# Altium PCB STM32H743I-EVAL2PCBDESIGN.PcbDoc (part 15 of 23)
Units mil, origin at the board's own origin, x right, y up, seen from the top; angles counter-clockwise.
Board outline 6558 x 5417 mil, 8 copper layers (L1_TOP, L2_GND, L3_HS1, L4_POWER, L5_SIG, L6_HS2, L7_GND, L8_BOTTOM), stack 61.368 mil thick; 620 components, 588 nets, 2945 pads, 1724 vias.
Unrouted connection lines stored in the file: 1.
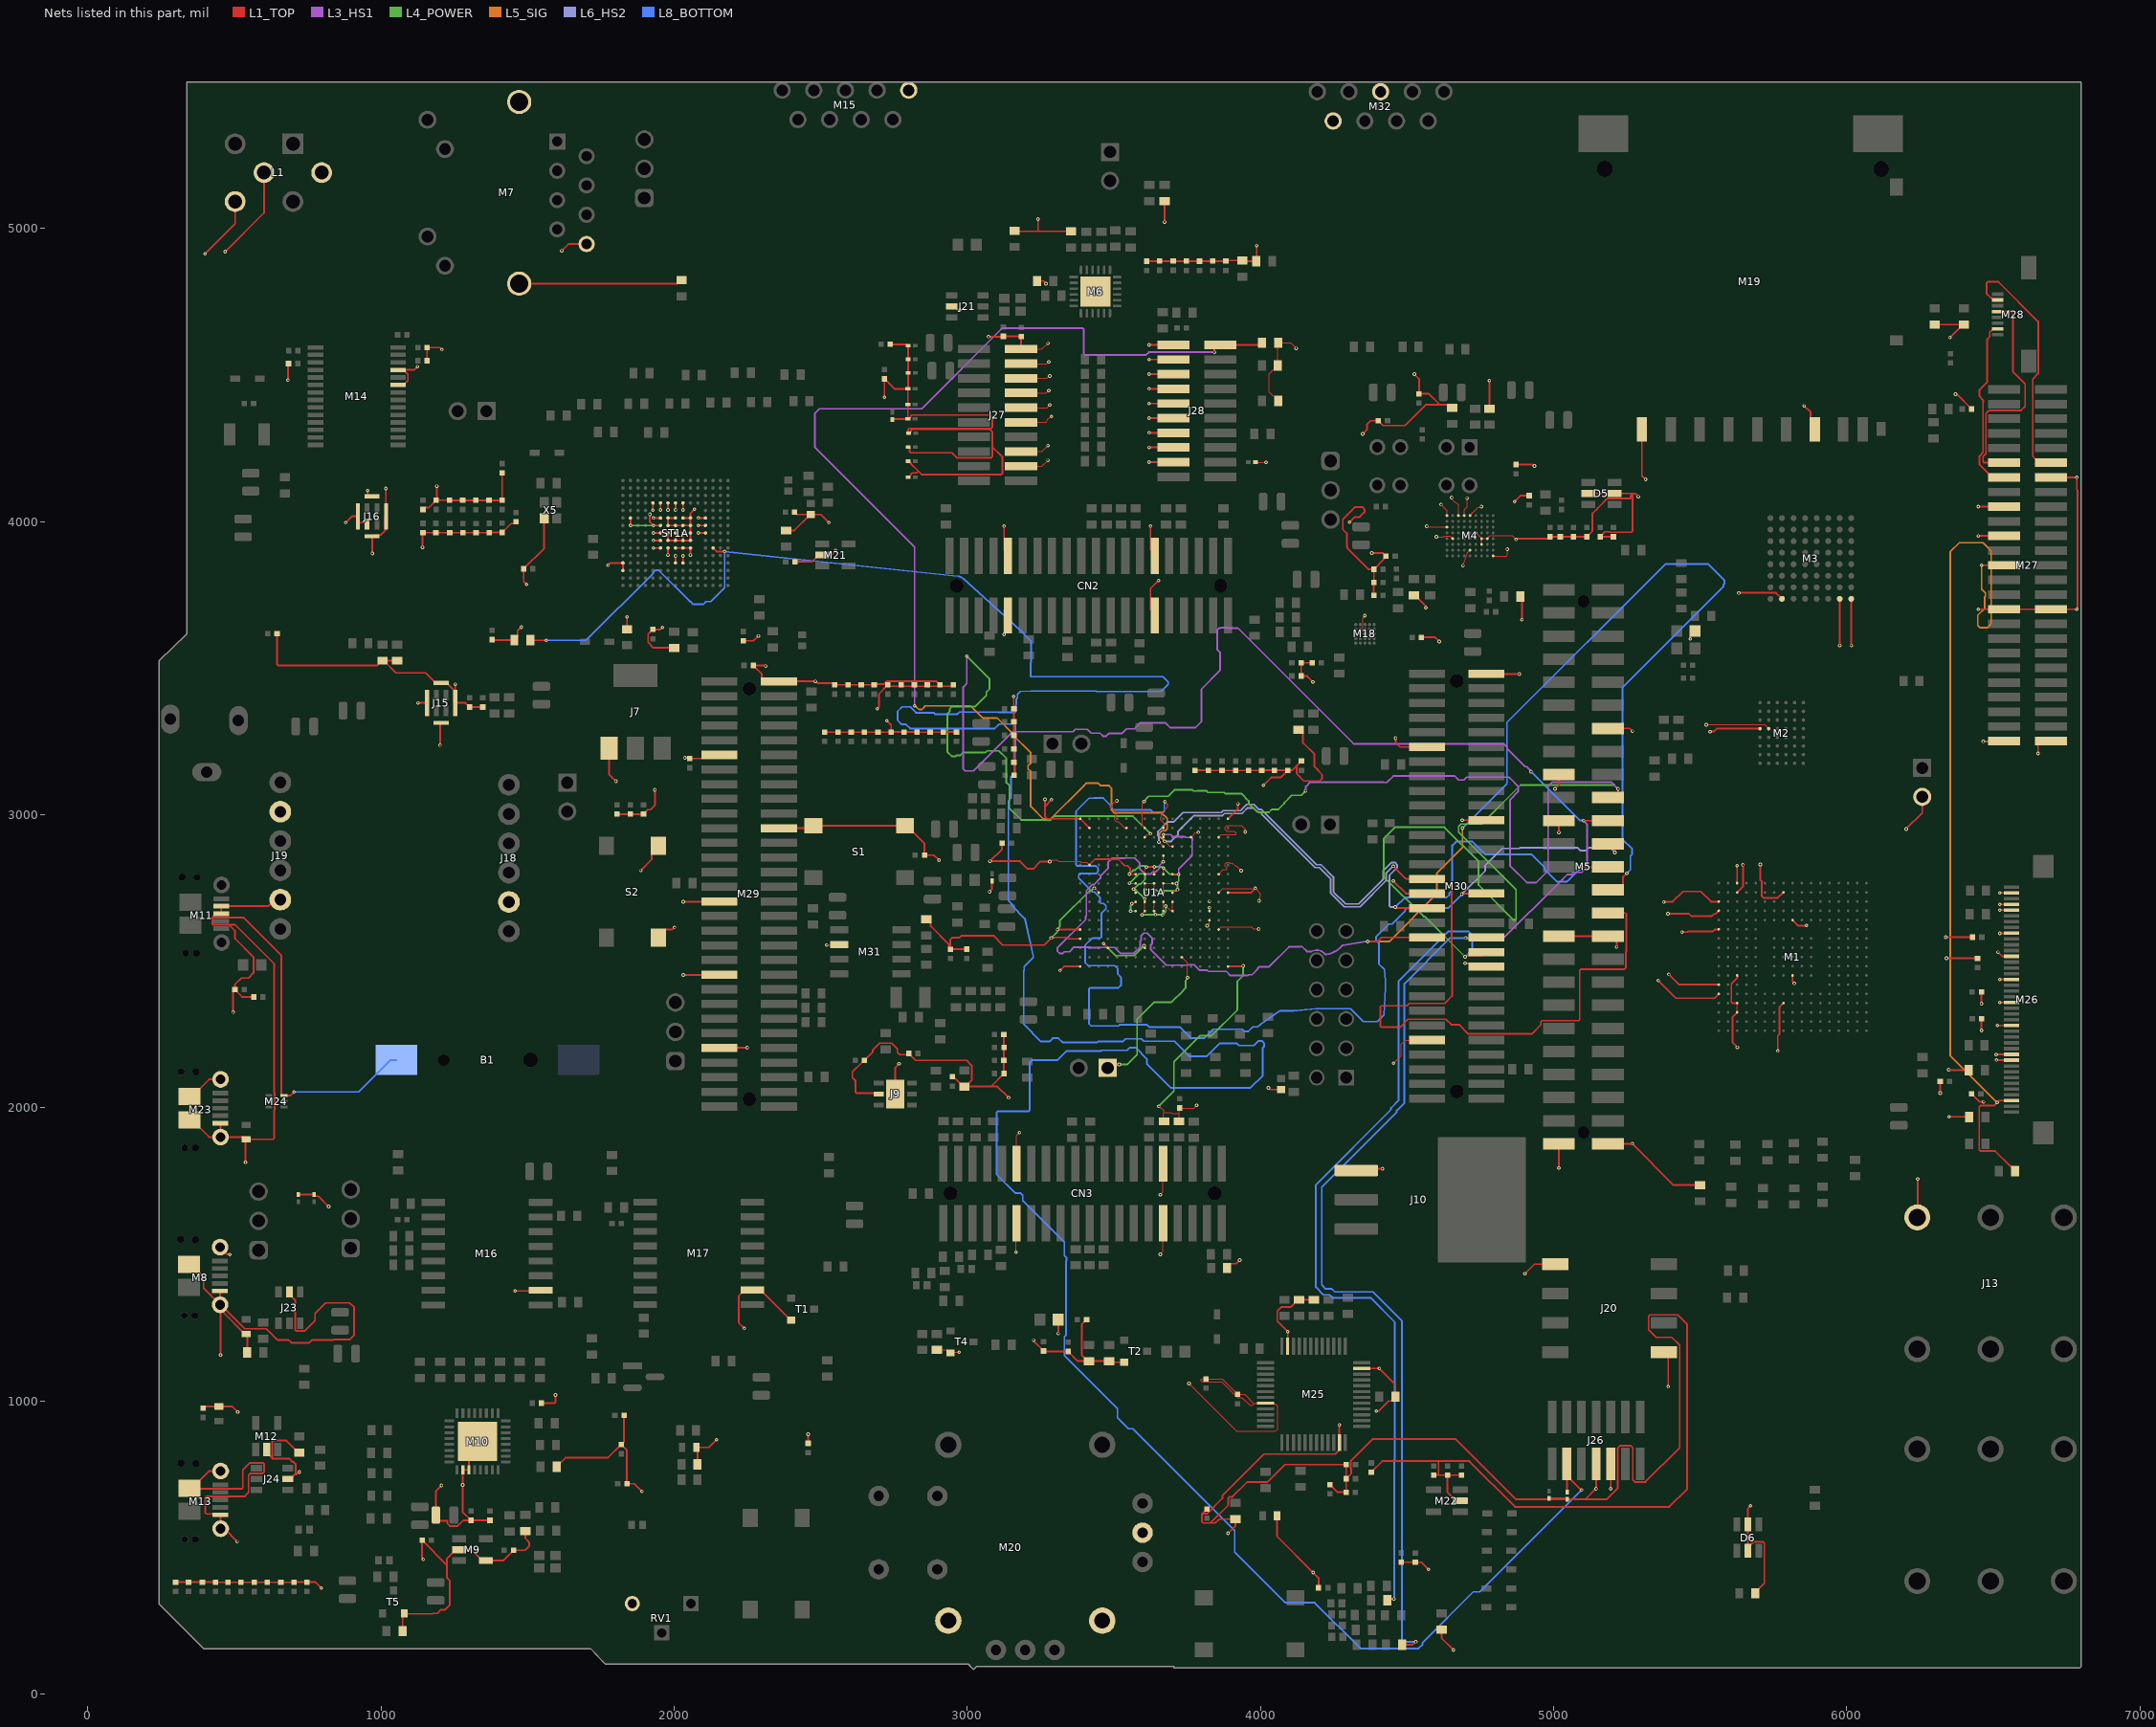
[diagram p12: the nets of this part, all layers, seen from the top]

## Via types
v1: diameter 12, hole 6, L1_TOP to L8_BOTTOM, tented both sides, 1724 vias

## Nets (pads, with @x,y where several pads share a name; then routed paths per layer and width w, separated by ;. In a path a pad name is that pad's centre, name@x,y a point inside that pad or via, vN(x,y) a via of type N, cw(c..) or ccw(c..) an arc to the next point about the centre after c; other vN are vias at no path point) (continued)
GND: B1.N C1.1 C2.1 C3.1 C4.1 C6.2 C7.2 C8.2 C9.2 C10.2 C11.2 C12.1 C13.1 C14.1 C15.1 C16.1 C17.1 C18.2 C19.2 C20.2 C21.2 C22.2 C23.2 C24.2 C25.2 C26.2 C27.2 C28.2 C29.2 C30.2 C31.2 C32.2 C33.2 C34.2 C35.2 C36.1 C37.2 C38.2 C39.2 C40.2 C41.2 C42.2 C43.2 C44.2 C45.2 C46.2 C47.1 C48.2 C49.2 C50.2 C51.2 C52.2 C53.2 C54.2 C55.2 C56.2 C57.2 C58.2 C59.2 C60.2 C61.2 C62.2 C63.2 C64.2 C65.2 C66.2 C67.2 C68.2 C69.2 C70.2 C71.2 C72.2 C73.2 C74.2 C75.2 C76.2 C77.2 C78.2 C79.2 C85.2 C87.2 C88.2 C89.2 C92.2 C93.2 C94.2 C95.2 C97.2 C98.2 C99.2 C100.2 C101.2 C102.2 C103.2 C104.1 C105.2 C106.2 C107.2 C108.2 C109.2 C110.2 C111.2 C112.2 C113.2 C114.2 C115.2 C116.2 C118.2 C119.2 C121.2 C124.2 C125.2 C126.2 C127.2 C128.2 C129.2 C130.2 C131.2 C132.2 C133.1 C134.2 C135.2 C136.2 C137.2 C138.2 C139.2 C140.2 C141.2 C142.2 C143.2 C144.2 C145.2 C146.2 C147.2 C148.2 C149.2 C150.2 C151.2 C152.2 C153.2 C154.2 C155.2 C156.2 C157.2 C158.2 C159.2 C160.2 C161.2 C162.2 C163.2 C164.2 C165.2 C166.2 C167.2 C168.2 C170.2 C171.2 C172.1 CN2.09 CN2.10 CN2.29 CN2.30 CN3.09 CN3.10 CN3.29 CN3.30 D2.2 D5.2 D5.5 D6.2 D6.5 D7.2 D10.2 D11.2 D12.2 D15.1 D22.2 D23.2 D24.2 D25.2 D26.2 D27.2 D28.2 D29.2 D30.2 D31.2 D32.2 D33.2 D34.2 D35.2 D36.2 D37.2 D38.2 J7.1 J9.2 J9.7 J10.1 J12.2 J13.3 J15.5 J16.2 J16.5 J18.2 J19.2 J19.5 J20.02 J20.07 J21.2 J23.2 J24.2 J25.1 J26.5 J26.7 J27.3 J27.5 J27.9 J27.11 J27.13 J27.15 J27.17 J27.19 J28.4 J28.6 J28.8 J28.10 J28.12 J28.14 J28.16 J28.18 J28.20 L1.4 L1.5 L1.6 L4.2 L7.2 LD1.1 M1.A3 M1.B3 M1.B8 M1.C1 M1.D1 M1.E9 M1.F1 M1.L3 M1.L9 M1.M1 M1.N1 M1.P3 M1.P8 M1.R3 M2.D1 M2.D2 M3.H2 M3.H7 M3.H8 M4.A1 M4.A3 M4.A4 M4.A5 M4.C1 M4.D6 M4.E2 M4.E7 M4.E8 M4.F7 M4.G5 M4.H9 M5.1 M5.2 M5.19 M5.20 M5.30 M5.34 M5.37 M6.25 M7.8 M7.13 M7.14 M8.5 M8.6 M8.7 M8.10 M9.2 M9.4 M10.18 M10.19 M10.33 M11.2 M11.3 M12.2 M13.5 M13.6 M13.7 M13.10 M14.23 M14.25 M15.5 M16.10 M17.10 M18.C3 M19.6 M19.9 M20.5 M20.7 M20.8 M21.2 M22.2 M23.5 M23.6 M23.7 M23.10 M23.11 M24.3 M25.8 M25.23 M25.35 M25.47 M26.10 M26.11 M26.16 M26.20 M26.24 M26.28 M26.32 M26.36 M26.37 M26.39 M27.01 M27.02 M27.19 M27.20 M27.30 M27.34 M27.37 M29.10 M29.20 M29.30 M29.39 M29.50 M29.59 M30.10 M30.19 M30.30 M30.39 M30.50 M30.59 M31.2 M32.3 M32.6 R34.2 R37.2 R67.2 R70.2 R72.2 R97.2 R114.2 R115.1 R116.1 R118.1 R120.2 R122.2 R136.1 R137.2 R142.2 R143.2 R144.2 R149.2 R150.2 R155.1 R159.2 R160.2 R176.2 R177.1 R185.2 R188.2 R205.2 R210.1 R211.2 R225.2 R227.2 R228.1 R231.1 R233.1 R234.1 R239.1 R240.2 R245.1 R247.1 R248.1 R257.2 R258.2 R259.2 R260.2 R265.2 R266.1 RV1.1 S1.3 S1.4 S2.3 S2.4 SB39.2 ST1A.D5 ST1A.D6 ST1A.D7 ST1A.D8 ST1A.D9 ST1A.F2 ST1A.F6 ST1A.F7 ST1A.F8 ST1A.F9 ST1A.F10 ST1A.F12 ST1A.G2 ST1A.G6 ST1A.G7 ST1A.G8 ST1A.G9 ST1A.G10 ST1A.G12 ST1A.H6 ST1A.H7 ST1A.H8 ST1A.H9 ST1A.H10 ST1A.H12 ST1A.J6 ST1A.J7 ST1A.J8 ST1A.J9 ST1A.J10 ST1A.K6 ST1A.K7 ST1A.K8 ST1A.K9 ST1A.K10 ST1A.M1 ST1A.M8 ST1A.M9 ST1A.N1 T1.2 T2.2 T4.2 T5.2 U1A.A1 U1A.A17 U1A.B2 U1A.B6 U1A.C10 U1A.C13 U1A.C16 U1A.F2 U1A.G7 U1A.G8 U1A.G9 U1A.G10 U1A.G11 U1A.G16 U1A.H7 U1A.H8 U1A.H9 U1A.H10 U1A.H11 U1A.J3 U1A.J7 U1A.J8 U1A.J9 U1A.J10 U1A.J11 U1A.J16 U1A.J17 U1A.K7 U1A.K8 U1A.K9 U1A.K10 U1A.K11 U1A.K15 U1A.L7 U1A.L8 U1A.L9 U1A.L10 U1A.L11 U1A.L15 U1A.M15 U1A.N1 U1A.N16 U1A.P1 U1A.R4 U1A.R8 U1A.T12 U1A.U1 U1A.U17 X5.2 | length 54274.5
  L1_TOP w2: v1(3433.07,2748.98) U1A.J3@3448.04,2734.01 ; v1(3464.57,2560) U1A.R4@3479.54,2545.03 ; v1(3603,2553) 3604.26,2551.74 3604.26,2546.29 U1A.R8@3605.52,2545.03 ; U1A.C10@3668.51,2922.98 3668.76,2923.23 3668.76,2931.76 v1(3669,2932) ; U1A.C13@3763,2922.98 3779,2938.98 3786.98,2938.98 v1(3788,2940) ; v1(3818,2621) 3825.99,2628.99 U1A.M15@3825.99,2639.52 ; U1A.L15@3825.99,2671.02 v1(3825.99,2682.3) ; U1A.K15@3825.99,2702.51 v1(3826,2704) ; v1(4356,3679) 4349,3672 4349,3624 4356,3617 M18.C3@4356.5,3617 ; v1(4600,3948) 4623.33,3948 4626.33,3951 4646.94,3951 M4.E2@4655.94,3942 ; v1(4691,3850) 4702.12,3880.13 4705,3892.63 4705.59,3893.22 M4.G5@4715,3902.63 ; M4.D6@4734.69,3961.69 M4.E7@4754.37,3942 ; M4.F7@4754.37,3922.31 M4.E7@4754.37,3942 ; v1(4872,3939) 4859,3952 4784.06,3952 M4.E8@4774.06,3942 M4.E7@4754.37,3942
  L1_TOP w4: v1(2520,2555) 2560.7,2555 M31.2@2562.7,2557 ; R177.1@2896,1173.44 2930.82,1173.44 2940.66,1163.6 T4.2@2942.63,1163.6 2945.03,1166 v1(2972,1166) ; v1(3166,1507) 3166,1604 CN3.30@3168,1606 ; CN3.29@3168,1808.99 3168,1905 v1(3178,1915) ; J27.3@3183.12,4189 3255,4189 v1(3275,4209) ; J27.5@3183.12,4239 3255,4239 v1(3275,4259) ; J27.9@3183.12,4339 3270.03,4339 3272.86,4341.83 3272.86,4346.69 3285.16,4359 v1(3287,4359) ; J27.11@3183.12,4389 3272,4389 v1(3281,4398) ; J27.13@3183.12,4439 3269.03,4439 3277.03,4447 v1(3278,4447) ; J27.15@3183.12,4489 3272.03,4489 3280.03,4497 v1(3281,4497) ; J27.17@3183.12,4539 3269.84,4539 3275.84,4545 v1(3278,4545) ; J27.19@3183.12,4589 3255,4589 v1(3275,4609) ; v1(3281,2840) 3283.16,2840 3289.16,2846 3304.97,2846 3306.82,2844.15 3307.88,2844.15 3312.03,2840 3386.27,2840 3388.77,2837.5 3407.54,2837.5 U1A.F2@3416.54,2828.5 ; v1(3510,3047) 3507.84,3047 3501.84,3041 3500.03,3041 3493,3033.97 3493,3024.03 3507,3010.03 3507,2994.67 3502.03,2989.7 3502.03,2982.25 3507.3,2976.98 3515.41,2976.98 3536.97,2955.41 3541.6,2955.41 U1A.B6@3542.53,2954.48 ; v1@3553.56,2765.5 U1A.H7@3574.02,2765.5 ; v1@3553.56,2797 U1A.G7@3574.02,2797 ; v1(3557,2671) U1A.L7@3574.02,2671.02 ; v1(3561,2696) 3562.53,2697.53 3567.73,2697.53 3572.71,2702.51 U1A.K7@3574.02,2702.51 ; v1(3567,2746) 3568.53,2744.47 3568.53,2740.82 3574.02,2735.32 U1A.J7@3574.02,2734.01 ; v1(3596,2658) 3597.53,2659.53 3597.53,2663.03 3605.27,2670.77 3605.52,2670.77 U1A.K8@3605.52,2702.51 3605.26,2702.78 3605.26,2712.75 v1(3604.99,2713.02) ; v1(3604.99,2744.51) 3605.26,2744.25 3605.26,2734.27 U1A.J8@3605.52,2734.01 v1@3605.52,2713.54 ; v1@3605.52,2745.04 U1A.H8@3605.52,2765.5 U1A.H9@3637.02,2765.5 U1A.J9@3637.02,2734.01 ; U1A.G8@3605.52,2797 3605.52,2813.35 3611,2818.84 v1(3611,2821) ; U1A.K9@3637.02,2702.51 3637.02,2686.77 U1A.L9@3637.02,2671.02 3637.95,2670.09 3637.95,2664.38 3640.97,2661.36 v1(3640.97,2659.19) ; U1A.G9@3637.02,2797 3637.51,2797.49 3637.51,2818.6 v1@3637.02,2819.09 ; v1(3653,2005) 3653.44,2005 3661.71,1996.73 3664.27,1996.73 3671,1990 3671,1983.34 ; v1(3658,1499.99) 3668,1509.99 CN3.10@3668,1606 ; v1(3658,1702.98) 3668,1712.98 CN3.09@3668,1808.99 ; v1(3666,2658) 3666,2660.16 3667.58,2661.75 3667.58,2670.09 U1A.L10@3668.51,2671.02 U1A.K10@3668.51,2702.51 ; U1A.J10@3668.51,2734.01 U1A.H10@3668.51,2765.5 U1A.H11@3700.01,2765.5 3700.26,2765.25 3713.75,2765.25 v1(3714,2765) ; U1A.G10@3668.51,2797 v1@3668.51,2817.46 ; R72.2@3671,1953.56 3668.66,1955.9 3668.66,1981 3671,1983.34 ; v1(3677,2688) 3693.05,2671.95 3699.08,2671.95 U1A.L11@3700.01,2671.02 U1A.K11@3700.01,2702.51 ; J28.8@3694.88,4311 J28.8@3702.88,4303 ; J28.20@3694.88,4611 J28.20@3702.88,4603 ; U1A.J11@3700.01,2734.01 3708.47,2742.47 3715.47,2742.47 v1(3717,2744) ; U1A.G11@3700.01,2797 v1@3720.47,2797 ; R67.2@3722,1953.56 3722,1981 ; U1A.T12@3731.5,2513.54 3751,2494.04 v1(3751,2444) ; v1(3756,1059) 3919.25,895.75 4050.49,895.75 4058.33,903.59 4058.33,981.99 4050.49,989.83 4017,989.83 4014.91,991.92 3980.62,991.92 3972.7,984 3963.65,984 3936.27,1011.38 3921.05,1011.38 3868.05,1064.38 3801.15,1064.38 3796.36,1069.18 3796.36,1072.49 3798.7,1074.83 3868.92,1074.83 3921.92,1021.83 C162.2@3922,1021.83 3945.66,1021.83 3975.49,992 M25.8@4017,992 ; v1(3782,2008) 3773.17,1999.17 C20.2@3724,1999.17 3722,1997.17 3722,1981 ; U1A.N16@3857.49,2608.02 3866.49,2617.02 3931.37,2617.02 ; U1A.J16@3857.49,2734.01 3871.48,2748 3971,2748 3976.69,2742.31 ; U1A.G16@3857.49,2797 3873.53,2813.04 3883.71,2813.04 3886.06,2815.38 3886.06,2818.7 3879.98,2824.77 3879.98,2832.22 3885.26,2837.5 3892.71,2837.5 3896.21,2834 3904.54,2834 3914.53,2824.01 3918.99,2824.01 v1(3934,2809) ; U1A.C16@3857.49,2922.98 3866.49,2931.98 3914.8,2931.98 3917.15,2934.33 3917.15,2937.64 3910.59,2944.2 3886.54,2944.2 3879.98,2950.75 3879.98,2958.21 3885.26,2963.48 3935.18,2963.48 3945,2953.66 3945,2953 3948,2950 v1(3948,2940.83) ; 3931.39,2617 3968.73,2617 3975.73,2610 v1(3994,2610) ; v1(3982,2749) 4001,2730 4001,2722.16 3996.53,2717.7 3996.53,2707.53 v1(3995,2706) ; D33.2@3983.3,4203 3983.8,4202.5 4018.5,4202.5 v1(4019,4202) ; R258.2@4060.56,4412 4030,4442.56 4030,4503.44 R259.2@4059.56,4533 4059.56,4609 R260.2@4060.56,4610 4103,4610 v1(4122,4591) ; v1(4454,2152) 4479.77,2177.77 4479.77,2216.77 4494,2231 M30.10@4568,2231 ; v1(4567,3984) 4569.16,3984 4571.79,3981.37 4635.74,3981.37 M4.C1@4636,3981.11 ; v1(4616,4058) 4636.26,4037.74 M4.A1@4636.26,4020.74 ; v1(4652,4082) 4655.37,4074.27 4660.6,4069.04 4673.29,4060.71 4675.63,4058.37 4675.63,4021.26 M4.A3@4675.37,4021 ; M4.A4@4695.57,4021 4695.57,4040.34 4705,4049.77 v1(4705,4080) ; M4.A5@4715.26,4021 4722.49,4028.23 4722.49,4028.39 4732.1,4038 4732.26,4038 4743.73,4049.47 4752.47,4049.47 v1(4754,4051) ; M4.H9@4794,3883.2 4794.23,3882.97 4838.97,3882.97 4842,3886 v1(4842,3906) ; v1(5521,3307) 5720.42,3307 M2.D2@5733.89,3293.53 ; M1.R3@5626.51,2325.54 M1.P3@5626.51,2357.04 ; 3671,1983.34 3695.33,1983.34 3697.67,1981 3722,1981
  L1_TOP w6: C52.2@299,381 C63.2@343,381 C53.2@390,381 C54.2@435,381 435.33,380.67 C55.2@478,380.67 478.17,380.83 C62.2@522,380.83 522.17,380.67 C59.2@567,380.67 567.17,380.83 C60.2@611,380.83 C48.2@658,380.83 C66.2@703,380.83 703.17,381 C49.2@747,381 776,381 v1(796,361) ; M8.10@344.3,1465.37 352.3,1465.37 394.09,1423.57 394.09,1384.07 M8.7@450.59,1327.57 450.59,1373.83 M8.5@449.61,1374.82 ; M13.10@346.3,701.37 M13.10@354.3,701.37 ; C116.2@393,974.83 398.77,980.61 D10.2@446,980.61 492.39,980.61 v1(511,962) ; v1(399,4914) 502,5017 L1.4@502,5092.15 ; 424.11,2650 436.11,2662 M11.3@454.61,2662 M11.2@454.61,2687.59 615.19,2687.59 637.6,2710 J19.5@656,2710 ; M8.6@450.59,1524.43 476.02,1499 v1(484,1499) ; M23.5@451.31,1947.19 452.3,1946.2 M23.7@452.3,1899.94 ; v1(452,1156) M8.7@452,1326.17 ; M23.6@452.3,2096.8 413.06,2096.8 354,2037.74 M23.10@346,2037.74 M23.11@346,1959 354,1959 413.06,1899.94 M23.7@452.3,1899.94 ; M13.6@452.59,760.43 413.35,760.43 M13.10@354.3,701.37 ; M8.7@460.35,1317.82 460.35,1303.12 535.08,1228.39 D7.2@540,1228.39 543.44,1224.95 R149.2@543.44,1165 ; M8.7@461.49,1318.95 534.66,1245.78 608.63,1245.78 646.4,1208 683.93,1208 693.93,1198 754.87,1198 764.87,1208 837.86,1208 838.86,1209 892.65,1209 908,1224.35 908,1318.65 892.65,1334 810.47,1334 774.39,1297.91 774.39,1274.09 738.3,1238 710.5,1238 706.4,1242.1 706.4,1344.1 687,1363.5 J23.2@687,1371.75 ; v1(468,4921) 600.43,5053.43 L1.5@600.43,5190.57 ; v1(495,2326) 495,2396.83 C4.1@501.17,2403 501.17,2421.3 522.53,2442.66 547.18,2442.66 564.4,2459.88 564.4,2514.12 501.17,2577.35 501.17,2604.42 481.18,2624.41 ; C4.1@501.17,2402.92 526.08,2378 C3.1@565.17,2378 ; v1(509,520) 465.43,563.57 M13.7@452.59,563.57 452.59,609.83 448.02,614.41 403.57,614.41 400.05,617.92 400.05,670.49 403.57,674 535.04,674 548,686.96 548,746.9 552.8,751.7 595.7,751.7 600.5,756.5 600.5,784.3 596.4,788.4 552.1,788.4 528,764.3 528,703.11 524.49,699.59 356.07,699.59 M13.10@354.3,701.37 ; v1(537,1814) 537,1890.39 D22.2@539,1892.39 ; M12.2@610,833.72 610,821.91 628.81,803.1 632.69,803.1 ; C6.2@644.67,3618 644.67,3512.51 648.18,3509 986.77,3509 990.28,3512.51 990.28,3514.66 1001.06,3525.44 R227.2@1005,3525.44 ; J24.2@681.75,733 J24.2@690,733 ; v1(682,4483) 682,4536.83 C121.2@684.17,4539 ; v1(703,2054) 690.69,2041.69 M24.3@668.59,2041.69 661.7,2041.69 659.78,2043.61 659.78,2519.36 530.73,2648.41 426.45,2648.41 424.11,2646.07 424.11,2626.75 426.45,2624.41 481.18,2624.41 ; D25.2@718,1703.3 D26.2@771,1703.3 771,1701 773.91,1698.09 785.91,1698.09 v1(821,1663) ; v1(721,757) 719.38,757 711.45,749.07 706.07,749.07 J24.2@690,733 ; R185.2@721,823.44 717.06,823.44 676.16,864.35 632.69,864.35 628.59,860.25 628.59,807.2 632.69,803.1 ; v1(879,3996) 901,4018 J16.5@920.77,4018 920.77,4000.19 924.66,3996.3 947.39,3996.3 J16.2@952.27,3991.43 ; v1(954,4106) 954,4089.8 957.89,4085.91 J16.5@969,4085.91 ; v1(970,3891) 970,3949.09 J16.5@969,3950.09 972.89,3953.98 998.9,3953.98 1013.34,3968.42 1013.34,4014.11 J16.5@1017.23,4018 1016,4019.23 v1(1016,4113) ; R233.1@1055,3525.44 1008.94,3525.44 1050.43,3483.94 1151.43,3483.94 1186.03,3449.34 1223.43,3449.34 1249.07,3423.7 1249.07,3385.31 J15.5@1252.96,3381.43 ; M14.23@1058,4466.39 1077,4466.39 1091.5,4480.89 1091.5,4503.07 M14.25@1077,4517.57 ; M14.25@1058,4517.57 M14.25@1077,4517.57 ; R188.2@1073.56,214 1073.56,268.79 T5.2@1079.4,274.63 1081.03,273 1176.14,273 1177.77,274.63 1192.14,274.63 1204.51,287 1218.65,287 1234,302.35 1234,387.46 1224,397.46 1224,439.92 ; v1(1124,4529) 1112.57,4517.57 M14.25@1077,4517.57 ; v1@1125,3381 v1(1125.43,3381.43) J15.5@1156.5,3381.43 ; v1(1141,3912) 1141,3960.17 C148.2@1143,3962.17 1186.83,3962.17 C147.2@1187,3962.33 1187.33,3962 C143.2@1234,3962 C144.2@1279,3962 C145.2@1324,3962 1324.17,3962.17 C139.2@1369,3962.17 1369.83,3963 C141.2@1413,3963 1413.08,3963 1443.04,3992.95 1453.78,3992.95 C142.2@1460,3999.17 ; C155.2@1143,4041.17 1149.22,4047.38 1162.3,4047.38 1187.92,4073 C154.2@1188,4073 ; v1(1144,459) 1140,463 C104.1@1140,524 1140,523.92 1224,439.92 ; C118.2@1156.83,4549 1156.83,4593.83 C119.2@1157,4594 1200,4594 v1(1207,4587) ; v1(1190,4121) 1190,4075 C154.2@1188,4073 ; v1(1201,3237) 1201,3309.78 J15.5@1204.73,3313.51 ; v1(1206,711) 1187,692 SB39.2@1187,610 1187,602.16 1198.66,590.5 1226,590.5 1226,581.49 1234.49,573 1261.51,573 1280.67,592.17 C111.2@1307,592.17 ; v1(1253,3445) 1253,3381.46 J15.5@1252.96,3381.43 ; M10.33@1329,861 1299,831 M10.19@1299,764.5 M10.18@1279,764.5 1278,763.5 v1(1278,713) 1278,621.08 1306.92,592.17 C111.2@1307,592.17 ; C89.2@1347,3367.17 C85.2@1302,3367.17 1301.92,3367.17 1287.66,3381.43 J15.5@1252.96,3381.43 ; C112.2@1371,592 1370.83,592.17 C111.2@1307,592.17 ; C151.2@1379,3597.17 1380.17,3596 R257.2@1454.44,3596 1465.22,3606.78 1465.22,3627.22 v1(1478,3640) ; C172.1@1413,4166.33 C140.2@1413,4072.83 C146.2@1368,4072.83 1323.17,4072.83 C149.2@1323,4072.67 1278.17,4072.67 C150.2@1278,4072.83 1233.17,4072.83 C153.2@1233,4073 C154.2@1188,4073 ; v1(1457,1375) 1542.27,1375 M16.10@1544.27,1377 ; M7.14@1470.99,4811.98 2009.48,4811.98 2021.06,4823.56 R37.2@2025,4823.56 ; C132.2@1486.17,3839 1486.17,3795.83 v1(1496,3786) ; C132.2@1486.17,3839.08 1556,3908.92 X5.2@1556,4010.88 ; R159.2@1492,555.44 1492,530.64 1505,517.64 1505,503.62 1491.38,490 C105.2@1451.67,490 1451.67,489.92 1416.35,454.6 M9.4@1357.28,454.6 1345.46,454.6 1308.06,492 M9.2@1266.72,492 1254.91,492 1224,461.09 1224,439.92 ; C110.2@1546.83,992 1591.49,992 1595,995.51 v1(1595,1020) ; R176.2@1598.56,775 1629.56,806 1774.25,806 1818.92,850.67 C113.2@1819,850.67 C113.2@1819.08,850.67 ; v1(1616,4924) 1639.02,4947.02 M7.8@1700.91,4947.02 ; v1(1774,3851) 1781.82,3858.82 ST1A.M1@1825.05,3858.82 ST1A.N1@1825.05,3833.23 ; J7.1@1777.45,3226.98 1777.45,3137.55 v1(1801,3114) ; C11.2@1805,3002 C10.2@1850,3002 1894.83,3002 C8.2@1895,3002.17 1895.08,3002.17 1909.79,3016.87 1919.25,3016.87 1934,3031.62 v1(1934,3085) ; C115.2@1828.83,950 1828.83,860.5 1825.3,856.97 1825.3,856.88 C113.2@1819.08,850.67 ; R225.2@1839,3633 v1(1839,3675) ; v1(1850.64,3986.77) ST1A.F2@1850.64,4012.36 ; v1(1886,2810) 1922.99,2846.99 1922.99,2870.91 S2.4@1945.58,2893.5 ; v1(1890,691) 1864,717 C114.2@1838.67,717 1838.67,831.08 C113.2@1819.08,850.67 ; v1(1917,4025) 1917,3998.64 v1(1928.87,3986.77) ST1A.G6@1953,3986.77 ; v1(1927,4039) 1927,4063.13 ST1A.D5@1927.41,4063.54 ; v1(1928.87,3910) ST1A.K6@1953,3910 ; v1(1928.87,3935.59) ST1A.J6@1953,3935.59 ; v1(1928.87,3961.18) ST1A.H6@1953,3961.18 ; v1(1928.87,4012.36) ST1A.F6@1953,4012.36 ; S2.3@1945.58,2580.5 1945.58,2585.43 1968.17,2608.02 1994.02,2608.02 v1(2001,2615) ; v1(1953,4039.41) ST1A.D6@1953,4063.54 ; v1(1960,3639) 1952.83,3631.83 C130.2@1927,3631.83 1926.92,3631.83 1910.7,3615.62 1910.7,3588.05 1929.31,3569.44 R228.1@2000,3569.44 ; v1(1978.59,3885.87) ST1A.K7@1978.59,3910 ; ST1A.H7@1978.59,3961.18 ST1A.J7@1978.59,3935.59 ST1A.J8@2004.18,3935.59 ; v1(1978.59,4039.41) ST1A.D7@1978.59,4063.54 ; ST1A.M8@2004.18,3858.82 v1(2004.18,3882.95) ; ST1A.K8@2004.18,3910 ST1A.K9@2029.77,3910 ST1A.K10@2055.36,3910 v1(2055.36,3885.87) ; ST1A.H8@2004.18,3961.18 ST1A.J8@2004.18,3935.59 ; ST1A.F8@2004.18,4012.36 ST1A.F7@1978.59,4012.36 ST1A.G7@1978.59,3986.77 ST1A.G8@2004.18,3986.77 ST1A.G9@2029.77,3986.77 ST1A.G10@2055.36,3986.77 ; v1(2004.18,4039.41) ST1A.D8@2004.18,4063.54 ; ST1A.M9@2029.77,3858.82 v1(2029.77,3882.95) ; ST1A.H9@2029.77,3961.18 ST1A.J9@2029.77,3935.59 ; ST1A.F9@2029.77,4012.36 ST1A.F10@2055.36,4012.36 ; v1(2029.77,4039.41) ST1A.D9@2029.77,4063.54 ; v1(2031,2453) M29.20@2153.5,2453 ; v1(2031,2703) M29.30@2153.5,2703 ; v1(2036,3194) 2050.67,3194 C171.2@2053,3191.67 2094.65,3191.67 2106.98,3204 M29.50@2154.5,3204 ; v1(2069,4042) 2055.36,4028.36 ST1A.F10@2055.36,4012.36 ; R211.2@2079.56,783 2079.56,837.05 D12.2@2075.61,841 2118,841 v1(2144,867) ; v1(2082.41,3961.18) ST1A.H12@2106.54,3961.18 ; v1(2082.41,3986.77) ST1A.G12@2106.54,3986.77 ; v1(2082.41,4012.36) ST1A.F12@2106.54,4012.36 ; M29.10@2155.5,2205 v1(2249,2205) ; C131.2@2236,3593.17 2270.17,3593.17 v1(2287,3610) ; v1(2239,1247) 2220.11,1265.89 2220.11,1358.24 2230.11,1368.24 2230.11,1369.19 2238.92,1378 M17.10@2267.27,1378 2295.61,1378 2304.43,1369.19 2304.43,1367.83 2396.66,1275.6 T1.2@2398.63,1275.6 ; C170.2@2269.83,3508.92 2298.98,3479.77 2298.98,3465 2309.98,3454 M29.59@2357.5,3454 ; C170.2@2269.83,3509 2310,3509 v1(2312,3507) ; M29.39@2357.5,2954 2465.92,2954 S1.4@2474.5,2962.58 S1.3@2787.5,2962.58 2792.42,2962.58 2853.83,2901.17 C21.2@2853.83,2862 2886,2862 v1(2903,2845) ; M29.59@2358.5,3455 v1(2481,3455) 2482.62,3455 2488.57,3449.05 2540.78,3449.05 C37.2@2547,3442.83 C38.2@2593,3442.83 C39.2@2638,3442.83 C40.2@2682,3442.83 2684.17,3445 2714.84,3445 2720.7,3450.86 2720.7,3451.5 2724.2,3455 2894.75,3455 2905.15,3444.6 2908.76,3444.6 C44.2@2915.36,3438 ; R231.1@2382,3969.56 2409.29,3969.56 2464.03,4024.3 D15.1@2466,4024.3 ; C152.2@2410.83,4032 2410.83,4031.92 2418.45,4024.3 D15.1@2466,4024.3 ; C133.1@2411.83,3863 2469.91,3863 2492.91,3886 M21.2@2504.72,3886 2536,3886 v1(2551,3901) ; C106.2@2457,855 v1(2457,886) ; C35.2@2513,3281.67 C33.2@2559,3281.67 2559.17,3281.5 C32.2@2604,3281.5 2604.17,3281.67 C31.2@2649,3281.67 C30.2@2695,3281.67 C29.2@2740,3281.67 ; v1(2528,3996) 2499.7,4024.3 D15.1@2466,4024.3 ; v1(2692.72,3361.31) 2698.3,3366.89 2698.3,3412.22 2728.92,3442.83 C41.2@2729,3442.83 2733.83,3438 C42.2@2774,3438 ; J9.2@2697.5,2047 2694.37,2050.13 2621.51,2050.13 2618,2053.65 2618,2093.47 2608,2103.47 2608,2122.53 2641.17,2155.7 2642.62,2155.7 2648.83,2161.92 2648.83,2162.08 2677.72,2190.97 2677.72,2197.55 2700.38,2220.22 2741.62,2220.22 2761.14,2200.7 2761.14,2189.74 2769.88,2181 2796.33,2181 C2.1@2800.33,2185 ; v1(2717,4424) C93.2@2717,4487.17 ; C93.2@2717.08,4487.17 2751.25,4453 D30.2@2797,4453 ; v1(2725.43,3320.57) 2740,3306 C29.2@2740,3281.67 ; C92.2@2736.83,4605 2790.54,4605 2795.54,4600 D27.2@2798,4600 D28.2@2798,4554 D29.2@2798,4507 2797.5,4506.5 2797.5,4453.5 D30.2@2797,4453 ; D32.2@2744,4348.7 2745.15,4349.85 2795.85,4349.85 D38.2@2797,4351 ; J9.7@2754,2047 2754,2137 v1(2767,2150) ; C42.2@2774,3443 C42.2@2774,3438 ; D35.2@2797.7,4152 2800.16,4152 2806.94,4158.78 2806.94,4160.8 2812.45,4166.32 2827.09,4166.32 2832.61,4171.83 ; D37.2@2797.7,4254 2800.16,4254 2803.06,4251.09 2803.06,4239.25 2807.37,4234.94 2947.56,4234.94 2965.06,4217.43 3080.7,4217.43 3084.8,4221.53 3084.8,4255.2 ; D36.2@2798,4206 2800.46,4206 2807.24,4199.22 2807.24,4197.2 2832.61,4171.83 ; C2.1@2800.33,2184.92 2823.78,2161.47 2997.49,2161.47 3014.72,2144.24 3014.72,2093.22 R97.2@2993.94,2072.44 ; C45.2@2819,3442.83 C45.2@2819,3438 ; R265.2@2860,2642.56 2863.94,2642.56 2874.72,2631.78 2874.72,2619.78 2935.7,2558.8 2935.7,2547.05 2941.92,2540.83 C1.1@2942,2540.83 ; C43.2@2863,3442.83 C43.2@2863,3438 ; C44.2@2907,3442.83 C44.2@2907,3438 ; J21.2@2946.25,4734 2954.5,4734 2967.5,4721 v1(2974,4721) ; C18.2@2949,2105.67 2955.22,2099.45 2959.05,2099.45 2986.06,2072.44 R97.2@2990,2072.44 R97.2@2993.94,2072.44 ; C46.2@2952,3442.83 2950.53,3442.83 2945.7,3438 C44.2@2915.36,3438 ; C36.1@2963,3281.83 2918.17,3281.83 C34.2@2918,3281.67 C27.2@2873,3281.67 C26.2@2828,3281.67 2827.83,3281.83 C28.2@2784,3281.83 2740.17,3281.83 C29.2@2740,3281.67 ; C9.2@2998,2541 2997.83,2540.83 C1.1@2942,2540.83 ; v1(3072,4631) 3121.83,4631 C103.2@3123,4632.17 C102.2@3183.17,4632.17 ; v1(3076,2737) 3076,2738.62 3084,2746.62 D2.2@3084,2773.7 ; C7.2@3119.17,2903 3118,2901.83 3118,2882 v1(3077,2841) 3179.47,2841 3205.47,2815 3224.53,2815 3249.53,2840 v1(3281,2840) ; C22.2@3124.67,2250 3124.67,2206.17 C23.2@3124.83,2206 3124.83,2116.92 3080.36,2072.44 ; v1(3125,3615.5) 3125,3698.5 ; 3125,3901.5 v1(3125,3984.5) ; v1(3141,2034) 3102.56,2072.44 3080.36,2072.44 ; v1(3158,3404) 3158,3361.67 C12.1@3158.67,3361 3158.67,3317.17 C13.1@3158.83,3317 C15.1@3158.83,3271 C16.1@3158.83,3224 C17.1@3158.83,3179 3159.83,3178 C14.1@3159.83,3135 ; R136.1@3161,4992.56 3163,4990.56 3241,4990.56 ; J27.19@3183.12,4589 3183.12,4632.12 C102.2@3183.17,4632.17 ; C102.2@3184,4631.33 C102.2@3183.17,4632.17 ; v1(3226,1207) 3226,1204.08 3259.92,1170.17 C109.2@3260,1170.17 3261.83,1168.33 C108.2@3344,1168.33 ; R143.2@3238.44,4821 3261,4821 3266.85,4815.15 3266.85,4813.15 v1(3268,4812) ; v1(3241,5032) 3241,4990.56 ; 3265,2993 3265,3029 v1(3287,3051) ; 3265,3029.6 v1(3265,3052) ; 3265.42,2992.58 3272.02,2985.98 U1A.A1@3385.05,2985.98 ; v1(3307.68,2608.02) U1A.N1@3385.05,2608.02 ; v1(3310,1230) 3310,1276.9 L7.2@3310.1,1277 ; v1(3316,2468) 3330.04,2482.04 U1A.U1@3385.05,2482.04 ; C108.2@3344.08,1168.33 3376.98,1135.44 R155.1@3415,1135.44 ; R137.2@3354,4990.56 3241,4990.56 ; U1A.P1@3385.05,2576.53 3342.68,2576.53 3338.21,2581 3296.62,2581 3295.76,2580.15 3287.15,2580.15 3262,2555 3121.04,2555 3089.04,2587 2979.53,2587 2972.53,2580 2947.51,2580 2942,2574.49 C1.1@2942,2540.83 ; U1A.A1@3385.59,2985.43 U1A.B2@3416.54,2954.48 ; C107.2@3406.67,1277 3406.67,1276.92 3390.28,1260.53 3390.28,1156.22 3411.06,1135.44 R155.1@3415,1135.44 ; U1A.F2@3416.54,2828.5 3436.05,2848 3514.62,2848 3536.62,2826 3546.38,2826 3555,2817.38 3555,2801.12 3553.03,2799.15 v1(3553.03,2797.53) ; J25.1@3478.43,2136 3490.43,2148 v1(3518,2148) ; T2.2@3534.63,1131.6 3486.84,1131.6 R160.2@3483,1135.44 R155.1@3415,1135.44 ; v1(3611,2821) 3611.5,2821.5 3637.5,2821.5 v1(3638,2822) ; C94.2@3612,4888.67 3655.67,4888.67 C95.2@3656,4889 C98.2@3702,4889 3746.83,4889 C97.2@3747,4888.83 3747.17,4888.67 C100.2@3792,4888.67 3792.17,4888.83 C101.2@3837,4888.83 C99.2@3882,4888.83 3884.17,4891 R142.2@3938,4891 3940,4889 R144.2@3985,4889 3987,4891 v1(3987,4942) ; v1(3619.88,4203) J28.4@3702.88,4203 ; v1(3619.88,4253) J28.6@3702.88,4253 ; v1(3619.88,4303) J28.8@3702.88,4303 ; v1(3619.88,4353) J28.10@3702.88,4353 ; v1(3619.88,4403) J28.12@3702.88,4403 ; v1(3619.88,4453) J28.14@3702.88,4453 ; v1(3619.88,4503) J28.16@3702.88,4503 ; v1(3619.88,4553) J28.18@3702.88,4553 ; v1(3619.88,4603) J28.20@3702.88,4603 ; 3625,3698.5 3625,3772 v1(3652,3799) ; 3625,3901.5 v1(3625,3984.5) ; v1@3669,2930.38 v1(3669,2932) ; v1(3673,5022) R266.1@3673,5093.44 ; C56.2@3777,3151.33 3821.67,3151.33 C57.2@3822,3151 C58.2@3869,3151 C61.2@3915,3151 C64.2@3959,3151 C65.2@4004,3151 4004.17,3151.17 C50.2@4048,3151.17 C51.2@4092.92,3151.17 ; C128.2@3817,630.83 3816.92,630.83 3800.7,614.62 3800.7,611.28 ; R70.2@3886.56,1453 3886.56,1456.94 3897.34,1467.72 3916.72,1467.72 v1(3929,1480) ; v1(3889,548) 3915,574 R210.1@3915,596.44 3859.29,596.44 3845.8,582.95 3829.2,582.95 ; U1A.U17@3888.98,2482.04 3937.42,2482.04 3939.38,2484 v1(3941,2484) ; U1A.J17@3888.98,2734.01 3968.38,2734.01 3976.69,2742.31 3982,2747.62 v1(3982,2749) ; U1A.A17@3888.98,2985.98 3923.01,3020 v1(3923.01,3036.99) ; v1(4010,3100) 4037,3127 4068.75,3127 C51.2@4092.92,3151.17 ; v1(4027,2068) 4032.7,2062.3 LD1.1@4071,2062.3 ; D11.2@4056.61,608 4056.61,537.39 v1(4180,414) 4198.17,395.83 C129.2@4198.17,362 ; M25.47@4092.59,1185.7 4093,1186.11 v1(4093,1236) 4057.28,1271.72 4057.28,1306.12 4071.11,1319.95 4103.45,1319.95 4128.06,1344.56 R239.1@4132,1344.56 R234.1@4182,1344.56 ; R205.2@4130,3289.44 4133.94,3289.44 4144.72,3278.66 4144.72,3245.13 4184,3205.84 4184,3164.04 4197,3151.04 4197,3150 4210,3137 4210,3122.62 4202.38,3115 4147.92,3115 4123.7,3139.22 4123.7,3166.7 ; C70.2@4139.92,3183 4123.7,3166.78 4123.7,3166.7 ; C125.2@4176.17,3518 C127.2@4138.83,3518 C126.2@4138.83,3473 4159,3473 v1(4179,3453) ; C159.2@4237,713.83 4237.08,713.83 4262.92,688 C158.2@4292.17,688 4292.17,733.83 C157.2@4292.33,734 C157.2@4292.33,734.08 ; M25.23@4269.26,857.85 v1(4269.26,917.56) ; M25.23@4269.76,857.35 4269.76,833.54 4262.58,826.36 4262.58,825.93 4254.65,818 4011.76,818 3870.28,676.52 3870.28,667.15 3818.52,615.38 3804.8,615.38 3800.7,611.28 ; v1(4304,3998) 4321.38,4015.38 4338.77,4015.38 4355,4031.62 4355,4042.38 4347.38,4050 4323.47,4050 4281,4007.53 4281,3972.84 4295,3958.84 4295,3914.54 4297,3912.54 4297,3908.62 4368.62,3837 C68.2@4386.83,3837 ; J10.1@4327.03,1786 4377.42,1786 4383.42,1792 v1(4416,1792) ; M25.35@4345.84,1110.6 v1(4405.56,1110.6) 4460.56,1055.6 R150.2@4460.56,1014 4460.56,1010.06 4449.78,999.28 4437.78,999.28 4403.5,965 v1(4395,965) ; v1(4349,4299) 4363.07,4313.07 4363.07,4331.07 4376,4344 C76.2@4402.17,4344 4402.17,4343.92 4418.38,4327.7 4492.95,4327.7 4564.59,4399.34 4611.54,4399.34 ; C160.2@4378,756.33 4415.71,794.05 4603.2,794.05 ; v1(4380,3893) 4416.83,3893 4421.53,3888.3 4421.62,3888.3 4427.83,3882.08 C88.2@4427.83,3882 4421.62,3875.78 4421.62,3871.87 4386.83,3837.08 C68.2@4386.83,3837 ; C67.2@4386.67,3748 4386.67,3791.67 C69.2@4387,3792 4386.83,3792.17 C68.2@4386.83,3837 ; v1(4453,2774) 4496,2731 M30.30@4568,2731 ; v1(4461,3261) 4461,3246 4476,3231 M30.50@4568,3231 ; C135.2@4480,449.33 4527.83,449.33 C134.2@4528,449.17 4548.83,449.17 v1(4573,425) ; R116.1@4523.67,3748.44 4527.6,3748.44 4564,3712.04 v1(4564,3706) ; v1(4525,4503) 4541,4487 C87.2@4541,4435.83 4575.05,4435.83 4611.54,4399.34 ; C124.2@4548.83,3605 4596,3605 v1(4610,3591) ; C136.2@4591,746.17 4603.17,746.17 ; R118.1@4618,219.44 4618,190 v1(4658,150) ; R120.2@4654,4388.56 4643.22,4399.34 4611.54,4399.34 ; M22.2@4681.08,659 4666.71,659 4638,687.71 C138.2@4638,746.17 ; C137.2@4686,746.17 C138.2@4638,746.17 ; v1(4688.13,2981) M30.39@4770.99,2981 ; v1(4698,2493) 4699,2492 4760,2492 M30.19@4770.99,2481 ; M30.59@4770.99,3481 4771.99,3480 v1(4883,3480) ; R114.2@4781,4385.56 v1(4781,4481) ; v1(4867,4068) 4887.83,4088.83 C77.2@4917,4088.83 ; v1(4872,3939) 4873.62,3939 4876.57,3941.95 4981.78,3941.95 C71.2@4988,3948.17 C72.2@5023,3948.17 C73.2@5068,3948.17 5113.08,3948.17 5132.7,3967.78 5132.7,4028.24 5150.53,4046.07 5150.53,4046.18 5183.69,4079.35 5262.87,4079.35 5262.87,4089.61 5269.26,4096 ; C74.2@4872,4194.83 4928.54,4194.83 4933.38,4190 v1(4935,4190) ; R115.1@4886.56,3744 4892,3738.56 v1(4892,3665) ; v1(4902.15,1433.37) 4934.78,1466 J20.02@5006.06,1466 ; D24.2@4985,666.7 5043.09,666.7 5046,663.79 D23.2@5046,663.7 5046.3,664 5109,664 v1(5145,700) J26.7@5145,785 ; v1(5005,3088) 5018,3101 M5.34@5018,3136.92 ; v1(5018,1794.22) M5.2@5018,1877.08 ; M5.20@5018,2585.74 5198.5,2585.74 5215,2569.24 v1(5215,2549) ; v1(5018,2939) M5.30@5018,2979.44 ; D23.2@5048.91,663.7 5048.91,661.24 5046,658.33 5043.09,661.24 5043.09,663.7 4871.17,663.7 4664.87,870 4383.58,870 4307.78,794.2 4307.78,769.8 4309.58,768 4309.58,751.33 C157.2@4292.33,734.08 ; 5109,663.7 5179.91,663.7 5219,702.79 5219,838.9 5227.1,847 5262.9,847 5270,839.9 5270,730.1 5277.1,723 5312.9,723 5429.92,840.02 5429.92,1189.81 5403.31,1216.41 5350.57,1216.41 5323.96,1243.02 5323.96,1288.98 5328.06,1293.08 5423.82,1293.08 5456,1260.9 5456,699.37 5394.96,638.33 4868.26,638.33 4712.54,794.05 4603.2,794.05 ; D5.2@5117.72,4096 D5.5@5208.28,4096 5269.26,4096 ; C78.2@5159,3948.17 5159.08,3948.17 C78.2@5159.25,3948.33 ; M5.1@5185.32,1877.08 v1(5268.18,1877.08) 5409.26,1736 R34.2@5500,1736 ; M5.37@5185.32,3294.4 5259.6,3294.4 v1(5269,3285) ; v1(5195,700) J26.5@5195,785 ; C79.2@5204,3948.33 C78.2@5159.25,3948.33 ; v1(5289,4085) 5278,4096 5269.26,4096 ; M19.9@5301.31,4314.24 5301.31,4156.69 v1(5314,4144) ; v1(5357,2434) 5417,2374 5548.98,2374 M1.N1@5563.52,2388.54 ; J20.07@5375.94,1166 5391,1150.94 v1(5391,1048) ; v1(5376,2702) 5376.95,2702.95 5405.95,2702.95 5441,2738 5502.14,2738 5537.19,2702.95 5562.97,2702.95 M1.C1@5563.52,2703.5 ; v1(5390,2662) 5461.84,2662 5469.84,2654 5540.05,2654 5547.05,2661 5552.52,2661 M1.D1@5563.52,2672 ; v1(5393,2455) 5427.97,2420.03 M1.M1@5563.52,2420.03 ; v1(5438,2599) 5455.86,2599 5458.86,2602 5544.62,2602 5551.08,2608.46 5562.97,2608.46 M1.F1@5563.52,2609.01 ; v1(5466,3600) 5467.09,3601.09 5467.09,3609.94 5482.59,3625.44 L4.2@5482.59,3627.02 ; v1(5534,3283) 5535.15,3284.15 5547.31,3284.15 5556.69,3293.53 5703.64,3293.53 M2.D1@5704,3293.17 ; v1(5626,2826) 5626.26,2825.74 5626.26,2766.74 M1.A3@5626.51,2766.49 ; M1.R3@5626.51,2325.54 5611,2310.03 5611,2222 v1(5627,2206) ; M1.P3@5626.51,2357.04 M1.P3@5626.51,2357.04 5610.03,2357 5606.51,2360.51 5606.51,2422.51 5626.51,2442.51 M1.L3@5626.51,2451.53 ; M1.B3@5626.51,2734.99 5646,2754.48 v1(5646,2829) ; v1(5632,3756) 5632.78,3756.78 5758.89,3756.78 M3.H2@5779.26,3736.41 ; D6.2@5663,487.72 D6.2@5663,499.54 ; v1(5672,642) 5663,633 D6.5@5663,578.28 D6.2@5663,499.54 ; R122.2@5688.56,343 5688.56,346.94 5719.21,377.59 5719.21,514.25 5715.11,518.35 5681.81,518.35 D6.2@5663,499.54 ; v1(5705,2830) 5705,2777.05 5710.54,2771.51 5710.54,2721.54 5716.09,2716 5765,2716 M1.B8@5783.99,2734.99 ; v1(5765,2194) 5765,2245.69 5770.93,2251.61 5770.93,2343.97 M1.P8@5783.99,2357.04 ; M1.L9@5815.24,2451.28 5815.49,2451.02 5815.49,2431.14 5821,2425.62 v1(5821,2424) ; M1.E9@5815.49,2640.5 5834.99,2621 5862,2621 v1(5863,2622) ; v1(5854.73,4395.24) 5877.15,4372.82 5877.15,4328.95 M19.6@5891.87,4314.24 ; v1@5976.24,3577.54 M3.H7@5976.24,3736.28 ; v1@6015.61,3577.54 M3.H8@6015.61,3736.28 ; v1(6203,2951) 6257.67,3005.67 J12.2@6257.67,3060.79 ; J13.3@6241,1626 6242,1627 v1(6242,1757) ; R248.1@6300,4672.44 R247.1@6400,4672.44 6396.06,4672.44 6352,4628.38 v1(6352,4628) ; v1@6319,2050.06 6319.17,2050.24 6319.17,2089.83 C166.2@6319,2090 ; v1(6338,2582) C167.2@6429.17,2582 ; v1(6340,2510) 6445.83,2510 C164.2@6446,2509.83 ; v1(6348,2130) 6349.62,2130 6351.62,2128 R240.2@6416.44,2128 ; v1(6349,1969) 6416.44,1969 R245.1@6417.44,1968 ; v1@6368,4435 6374.92,4435 6425.83,4384.08 C47.1@6425.83,4384 ; C168.2@6426.17,2047 6426.17,2046.92 6432.38,2040.7 6432.47,2040.7 6453.17,2020 v1(6467,2020) ; v1(6449,3701) M27.20@6537,3701 M27.19@6697,3701 v1(6785,3701) 6785,3702.62 6787,3704.62 6787,4106.38 6785,4108.38 v1(6785,4151) M27.37@6697,4151 ; v1(6449,3951) M27.30@6537,3951 ; v1(6449,4051) M27.34@6537,4051 ; v1@6459.67,2355.06 C165.2@6459.67,2395 ; v1@6459.83,2264.06 C163.2@6459.83,2304 ; v1(6466,3250) 6536,3250 M27.02@6537,3251 ; v1(6510,2181) 6510.5,2181.5 6561.61,2181.5 M26.11@6562.11,2181.99 ; v1(6511,2163) 6511.35,2162.65 6561.76,2162.65 M26.10@6562.11,2162.31 ; v1(6514,2281) 6514.29,2280.71 6561.82,2280.71 M26.16@6562.11,2280.42 ; v1(6516,2531) 6530.36,2516.64 M26.28@6562.11,2516.64 ; v1(6522,2733) 6522.17,2733.17 M26.39@6562.11,2733.17 ; v1@6522.17,2359.16 M26.20@6562.11,2359.16 ; v1@6522.17,2437.9 M26.24@6562.11,2437.9 ; v1@6522.17,2595.38 M26.32@6562.11,2595.38 ; v1@6522.17,2674.12 6522.26,2674.03 6562.02,2674.03 M26.36@6562.11,2674.12 ; v1@6522.17,2693.8 6522.26,2693.72 6562.02,2693.72 M26.37@6562.11,2693.8 ; v1(6653,3209) 6653,3239.5 6664.5,3251 M27.01@6697,3251 ; M23.7@452.3,1899.94 531.45,1899.94 D22.2@539,1892.39 ; 481.18,2624.41 502.18,2624.41 635,2491.58 635,2050.73 636.22,2049.51 636.22,1994.49 635,1993.27 635,1895.91 631.49,1892.39 D22.2@539,1892.39 ; 632.69,803.1 685.8,803.1 698.13,790.77 701.53,790.77 708,784.3 708,751 J24.2@690,733 ; ST1A.J8@2004.18,3935.59 ST1A.J9@2029.77,3935.59 ; ST1A.J9@2029.77,3935.59 ST1A.J10@2055.36,3935.59 ST1A.H10@2055.36,3961.18 ST1A.G10@2055.36,3986.77 ; ST1A.G10@2055.36,3986.77 ST1A.F10@2055.36,4012.36 ; C42.2@2774,3438 C45.2@2819,3438 ; D38.2@2797,4351 D31.2@2797,4399 D30.2@2797,4453 ; D38.2@2797,4351 2799.46,4351 2806.24,4357.78 2806.24,4359.8 2810.34,4363.91 3077.36,4363.91 3084.8,4356.47 3084.8,4321.53 3080.7,4317.43 2941.44,4317.43 2940.78,4318.09 2801.51,4318.09 2798,4314.58 2798,4304.91 2799,4303.91 D34.2@2799,4302 2801.46,4302 2808.24,4308.78 2808.24,4310.8 2812.34,4314.91 3076.36,4314.91 3084.8,4306.47 3084.8,4255.2 ; C45.2@2819,3438 C43.2@2863,3438 ; 2832.61,4171.83 2843.87,4160.57 3115.49,4160.57 3119,4164.08 3119,4221 3084.8,4255.2 ; C43.2@2863,3438 C44.2@2907,3438 ; C44.2@2907,3438 C44.2@2915.36,3438 ; R97.2@2993.94,2072.44 3080.36,2072.44 ; 3800.7,611.28 3800.7,587.05 3804.8,582.95 3829.2,582.95 ; 3829.2,582.95 3833.8,587.55 3833.8,587.92 3890.28,644.41 3890.28,668.24 3894.38,672.34 3904.4,672.34 3955.28,723.22 4024.06,723.22 4083.18,782.34 4292,782.34 C156.2@4292.33,782 C157.2@4292.33,734.08 ; C51.2@4092.92,3151.17 4108.17,3151.17 4123.7,3166.7 ; 4603.17,746.17 C138.2@4638,746.17 ; 4603.17,746.17 4607.3,750.3 4607.3,789.95 4603.2,794.05 ; C78.2@5159.25,3948.33 5169.59,3958.67 5169.59,3960.33 5174.84,3965.58 5190,3965.58 5191.8,3963.78 5265.74,3963.78 5269.26,3967.3 5269.26,4096
  L3_HS1 w6: v1(3669,2932) 3693.62,2932 3700.62,2925 3741.04,2925 3743.67,2922.37 3765.05,2922.37 3768.57,2918.85 3768.57,2913.88 3766.53,2911.84 3766.53,2859.91 3721,2814.38 v1(3721,2796.47)
  L4_POWER w6: v1(1850.64,3986.77) v1(1928.87,3986.77) ; v1(3286,2579) 3306.53,2599.53 3306.53,2606.88 v1(3307.68,2608.02) 3307.68,2609.65 3315,2616.97 3315,2637.87 3419.13,2742 3424.47,2742 3431.45,2748.98 v1(3433.07,2748.98) ; v1(3464.57,2560) 3505.57,2519 3569,2519 v1(3603,2553) ; v1(3518,2148) 3546.53,2148 3579.12,2180.59 3579.12,2301.65 3637.78,2360.31 3696.69,2360.31 3737,2400.62 3737,2401.53 3745,2409.53 3745,2434.38 3748,2437.38 3748,2439.38 3751,2442.38 v1(3751,2444) ; v1(3553.03,2766.03) 3585.1,2798.1 3602,2798.1 3605.92,2794.18 3605.92,2778.62 3590.18,2762.88 3583.88,2762.88 v1(3567,2746) 3568.15,2744.85 3573.16,2744.85 v1(3604.99,2713.02) ; v1(3553.03,2797.53) 3565.5,2810 3571.54,2810 3586.64,2825.1 3605.28,2825.1 3609.38,2821 v1(3611,2821) ; v1(3557,2671) 3557,2690.38 3561,2694.38 v1(3561,2696) ; v1(3596,2658) 3596.6,2658.6 3640.38,2658.6 v1(3640.97,2659.19) 3641.57,2658.6 3665.4,2658.6 v1(3666,2658) 3677,2669 v1(3677,2688) ; v1(3604.99,2744.51) 3643.1,2744.51 3647.62,2740 3711.38,2740 3715.38,2744 v1(3717,2744) 3717,2760.38 3714,2763.38 v1(3714,2765) 3714,2766.62 3721,2773.62 v1(3721,2796.47) 3690.56,2796.47 v1(3669.04,2817.99) 3667.42,2817.99 3663.41,2822 v1(3638,2822) ; v1(3653,2005) 3705,2057 3705,2156.73 3793.44,2245.17 3832.56,2245.17 3921,2333.62 3921,2431.38 3941,2451.38 v1(3941,2484)
  L8_BOTTOM w6: v1(703,2054) 923.71,2054 1032.71,2163 B1.N@1052.39,2163
  other v1: 6319.17,2049.89 6460.01,2263.89 6459.84,2354.89 6522,2358.98 6522,2437.72 6522,2595.2 6522,2673.94 6522,2693.63 5976.37,3577.41 6015.74,3577.41 6371.46,4435 3437,4785
GNDDetect: D23.1 J26.11 R257.1 ST1A.K13 | length 11104.2
  L1_TOP w6: R257.1@1509.56,3596 1510.56,3595 v1(1563,3595) ; ST1A.K13@2132.13,3910 2144.13,3898 v1(2172,3898) ; D23.1@5046,688.3 5046,784 J26.11@5045,785 5045,745 5092.85,697.15 5094.85,697.15 v1(5096,696)
  L8_BOTTOM w6: v1(1563,3595) 1699.14,3595 1928,3823.86 1928,3826.38 1935.62,3834 1946.38,3834 2052.38,3728 2054.62,3728 2064.62,3718 2099.38,3718 2108.38,3727 2124,3727 2172,3775 v1(2172,3898) 2967.42,3813.75 cw(c2964,3781.5) 2985.87,3805.44 3180.38,3628.5 3215.85,3593.04 3217.6,3591.28 3217.6,3588.72 3217.05,3567.15 3215.46,3471 3667.14,3471 3685,3453.14 3685,3444.86 3660.45,3420.31 3440.16,3420.31 3438.46,3422 3218.33,3422 3218.01,3421.99 3180.37,3420 3171,3410.63 3171,3398.62 3166.35,3393.97 3165.62,3355.17 cw(c3159.62,3355.28) 3159.62,3349.28 3106.53,3349.28 3105.81,3350 2972.86,3350 2965.86,3343 2889.83,3343 2884.83,3348 2824.62,3348 2804.62,3368 2777.47,3368 2762,3352.53 2762,3322.47 2776.47,3308 2790.62,3308 2804.62,3294 3093.38,3294 3108.67,3309.28 3158.65,3309.28 cw(c3158.64,3303.28) 3164.64,3303.21 ; 3164.64,3303.17 3161.67,3145.17 cw(c3155.67,3145.28) 3159.91,3141.04 3149,3130.12 3149,3056 3140,3047 3140,2725.28 3140,2706.72 3153.28,2693.43 3153.28,2688.63 3196,2645.38 3225,2517.59 3225,2512.62 3223.24,2510.86 3194,2481.62 3194,2468.62 3192,2466.62 3192,2284.99 3250.99,2226 3280.47,2226 3291.47,2237 3310.53,2237 3324.53,2223 3443.3,2223 3446.3,2226 3530.79,2226 3539.79,2235 3593.43,2235 3601.66,2226.76 3705.69,2226.76 3756.45,2176 3817,2176 3861,2220 3918.81,2220 3926.47,2212.34 3977.96,2212.34 3993.62,2228 4004.38,2228 4012,2220.38 4012,2208.53 4008,2204.53 4008,2110 3966,2068 3693.72,2068 3613,2148.72 3613,2165.53 3573.53,2205 3554.47,2205 3545.47,2196 3458.73,2196 3455.73,2193 3337.51,2193 3306.66,2162.14 3219.51,2162.14 3213,2155.63 3213,1991.51 3209.49,1988 3103.51,1988 3100,1984.49 3100,1772 3163,1709 3181.38,1709 3189,1701.38 3189,1683 3331,1541 3331,1495.38 3338,1488.38 3338,1477.62 3337,1476.62 3337,1224.47 3331,1218.47 3331,1154.72 3512,973.72 3512,942.86 3549.97,904.89 3564.64,904.89 3912,557.53 3912,483.86 4084.86,311 4185.37,311 4341.37,155 4539.53,155 4553,168.47 4553,175.14 4725.86,348 4748,348 v1(5096,696)
HSYNC: M26.3 M27.26 R242.1 | length 3132.6
  L1_TOP w6: v1(6460,3851) M27.26@6537,3851 ; M26.3@6562.11,2024.51 6521.09,2024.47 6514.62,2018 v1(6513,2018) 6502,2007 6455.29,2007 6451.78,2003.49 6451.78,1856.38 6455.88,1852.28 6506.28,1852.28 6559.84,1798.72 6563.78,1798.72 6574.56,1787.94 R242.1@6574.56,1784
  L5_SIG w6: v1(6460,3851) 6460,3769.38 6473,3756.38 6473,3745.62 6471,3743.62 6471,3704.62 6447,3680.62 6447,3645.62 6454.62,3638 6479.14,3638 6493,3651.86 6493,3900.53 6465.53,3928 6384.23,3928 6353,3896.77 6353,2178 v1(6513,2018)
I2C_SCL: M27.40 M28.5 | length 776.7
  L1_TOP w6: M28.5@6514.56,4716.84 6563.49,4716.84 6567,4713.33 6567,4512.41 6609,4470.41 6609,4393.6 6594.9,4379.5 6486.1,4379.5 6475,4368.4 6475,4231.57 6465,4221.57 6465,4205 6469,4201 M27.40@6537,4201
I2C_SDA: M27.38 M28.2 | length 610.7
  L1_TOP w6: M28.2@6514.56,4657.79 6500.78,4657.79 6497.87,4654.88 6497.87,4654.52 6494.36,4651.01 6491.97,4651.01 6487.87,4646.91 6487.87,4631.1 6479.1,4622.33 6479.1,4476.01 6453,4449.91 6453,4427.14 6465.57,4414.57 6465.57,4406.29 6465,4405.72 6465,4235.72 6453,4223.72 6453,4194.5 6496.5,4151 M27.38@6537,4151
INT: M27.39 M28.7 | length 855.8
  L1_TOP w6: M28.7@6514.56,4756.21 6500.78,4756.21 6494,4762.99 6491.97,4762.99 6477,4777.97 6477,4814.49 6480.51,4818 6518.14,4818 6653.45,4682.69 6653.45,4505.28 6635,4486.83 6635,4222.5 6656.5,4201 M27.39@6697,4201
LCD_B0: J28.19 M5.21 M30.32 R260.1 U1A.D11 | length 7644.5
  L1_TOP w2: v1(3673,2909) 3689.87,2892.13 3699.37,2892.13 U1A.D11@3700.01,2891.49
  L1_TOP w6: v1(3843,4578) 3843,4591.43 3854.57,4603 J28.19@3863.12,4603 3998.44,4603 R260.1@4005.44,4610 ; v1(4453,2824) 4496,2781 M30.32@4568,2781 4615.52,2781 4634.52,2762 4636.56,2762 4652,2746.55 4652,2548.37 4654,2546.37 4654,2381.59 4628.41,2356 4507.59,2356 4499.48,2347.9 4412.51,2347.9 4409,2344.38 4409,2278.51 4412.51,2275 4476.59,2275 4503.58,2302 4632.42,2302 4650.87,2283.55 4677.81,2283.55 4709.36,2252 4925.75,2252 4957,2283.24 4957,2293.18 4961.1,2297.28 5085.49,2297.28 5089,2300.79 5089,2469.07 5092.51,2472.59 5242.49,2472.59 5246.32,2476.43 5246.32,2530.94 5248.32,2532.94 5248.32,2660.97 5244.81,2664.48 M5.21@5185.32,2664.48
  L3_HS1 w6: v1(2820,3371) 2820,3912.86 2480,4252.86 2480,4370.33 2494.67,4385 2844.38,4385 3119.38,4660 3393.49,4660 3397,4656.49 3397,4572.51 3400.51,4569 3610.19,4569 3619.19,4578 v1(3843,4578)
  L5_SIG w6: v1(2820,3371) 2821.62,3371 2824.62,3368 2825.62,3368 2834.62,3359 2845.38,3359 2853,3366.62 2853,3367.49 2856.51,3371 3010.69,3371 3051.69,3330 3101.67,3330 3158.49,3273.18 3158.49,3269.19 3216,3211.69 3216,3175.79 3207,3166.79 3207,3156.02 3216,3147.02 3216,3028 3260,2984 3261.33,2984 3263.33,2986 3284.47,2986 3397.47,3099 3406.47,3108 3445.53,3108 3454.53,3099 3483.38,3099 3491.67,3090.72 3491.67,3015.67 3501.33,3006 3663,3006 3682,2987 3682,2952.18 3674.82,2945 3663.62,2945 3656,2937.38 3656,2926 v1(3673,2909)
  L6_HS2 w6: v1(3673,2909) 3695.38,2909 3719,2932.62 3719,2943.01 3772.99,2997 3869.95,2997 3876.95,3003.99 3936.68,3003.99 3940.68,3008 3955.68,3023 3975.19,3023 3990.19,3008 3997.71,3008 4008.71,2997 4186.33,2819.38 4201.14,2819.38 4239,2781.53 4239,2732.38 4286.01,2685.38 4339.24,2685.38 4428.38,2774.53 4428.38,2799.38 v1(4453,2824)
LCD_B1: M5.23 M30.24 U1A.E10 | length 5388.1
  L1_TOP w4: v1@3668.51,2839.53 U1A.E10@3668.51,2859.99
  L1_TOP w6: v1(4366,2567) 4398.62,2567 4412.62,2581 M30.24@4568,2581 ; M5.23@5185.32,2743.22 5219.82,2743.22 5236.32,2759.72 5236.32,2786.32 v1(5250,2800)
  L3_HS1 w6: v1(3667.98,2839) 3654.88,2825.9 3654.88,2816.95 3642.93,2804.99 3632.16,2804.99 3624.17,2797 3606.62,2797 3588.5,2815.12 3588.5,2833.88 3570.38,2852 3536.62,2852 3535.62,2851 3493.62,2851 3480,2837.38 3480,2816.62 3454,2790.62 3454,2783.02 3432.96,2761.98 3427.69,2761.98 3406,2740.29 3406,2654.27 3404,2652.27 3404,2642.38 3306.96,2545.35 3306.96,2534.58 3314.58,2526.96 3325.35,2526.96 3330.38,2532 3348.38,2532 3356,2539.62 3356,2540.38 3363.62,2548 3417.62,2548 3419.62,2546 3453.16,2546 3454.16,2547 3502.61,2547 3522.64,2526.96 3568.35,2526.96 3590,2548.62 3590,2568.62 3592.52,2571.14 3592.52,2585.9 3602.62,2596 3613.38,2596 3630,2579.38 3630,2559.62 3626,2555.62 3626,2539.33 3678.83,2486.5 3752.97,2486.5 3754.47,2488 3773.53,2488 3792.53,2469 3818.14,2469 3822.14,2465 3883.57,2465 3897.57,2451 3936,2451 3955.94,2451 3958.94,2454 3971.67,2454 3991,2473.33 3991,2477.49 3994.51,2481 4029.42,2481 4097.42,2549 4135.38,2549 4136.42,2550.03 4141.39,2550.03 4158.14,2533.28 4168.71,2533.28 ccw(c4171.58,2538.55) 4174.53,2533.33 cw(c4192,2503) 4219.01,2525.26 ccw(c4223.61,2529.11) 4224.45,2523.17 ccw(c4211.52,2610.6) 4277.19,2551.45 4278.07,2552.43 ; 4278.1,2552.46 4279.44,2553.8 4281.31,2554.13 4349.37,2566.02 v1(4366,2567)
  L5_SIG w6: v1(4366,2567) 4439.38,2567 4601.62,2729.23 4601.62,2800 4689,2887.38 v1(4689,2954)
  L8_BOTTOM w6: v1(4689,2954) 4840.85,3105.85 4840.85,3314.85 5381,3855 5527.38,3855 5583,3799.38 5583,3788.62 5579,3784.62 5579,3778 5234.62,3433.62 5234.62,2915.88 5268,2882.5 5268,2864.83 5262.12,2858.95 5262.12,2812.12 v1(5250,2800)
LCD_B2: M5.25 M30.28 U1A.D10 | length 2436.8
  L1_TOP w2: v1(3653.54,2906.46) U1A.D10@3668.51,2891.49
  L1_TOP w6: v1(4460,2685) 4461.62,2685 4465.62,2681 M30.28@4568,2681 ; v1(5090,2816.02) 5091.62,2816.02 5096.6,2821 5184.36,2821 M5.25@5185.32,2821.96
  L6_HS2 w6: v1(3653.54,2906.46) 3653.54,2923.48 3650.02,2927 3650.02,2942.4 3683.52,2975.91 3704.76,2975.91 3735.86,3007 3865.81,3007 3872.8,3013.99 3932.53,3013.99 3936.54,3018 3953.54,3035 3977.33,3035 3994.33,3018 4001.85,3018 4007.69,3012.17 4007.83,3012.17 4190.62,2829.38 4206.76,2829.38 4249,2787.15 4249,2736.53 4290.15,2695.38 4335.1,2695.38 4418.38,2778.67 4418.38,2797.82 4418.38,2807.77 4447.62,2837 4458.38,2837 4466,2829.38 4466,2818.62 4440,2792.62 4440,2688.51 4443.51,2685 v1(4460,2685)
  L8_BOTTOM w6: v1(4460,2685) 4461.21,2685 4493.21,2717 4634.2,2717 4644.34,2727.14 4644.34,2733.01 4654.49,2743.15 4654.49,2895.11 4667.37,2908 4723.14,2908 4767.14,2864 4925.38,2864 4968.5,2820.88 4968.5,2814.12 5011.62,2771 5044.98,2771 v1(5090,2816.02)
LCD_B3: M5.27 M30.29 U1A.B10 | length 4117.4
  L1_TOP w4: U1A.B10@3668.51,2954.48 3674,2959.97 3674,2967.76 3659.51,2982.25 3659.51,2989.7 3663.01,2993.2 3663.01,3001.3 3668,3006.29 3668,3011.67 3683,3026.67 3683,3031.97 3683.36,3032.33 3683.36,3035.64 v1(3674,3045)
  L1_TOP w6: v1(4687,2729) 4688.62,2729 4690.62,2731 M30.29@4770.99,2731 ; M5.27@5185.32,2900.7 5192.5,2900.7 5209,2884.2 v1(5209,2871)
  L6_HS2 w6: v1(4687,2729) 4766.92,2808.92 4766.92,2826.92 4825,2885 4884.03,2885 4886.73,2887.7 5081.33,2887.7 5091.33,2877.7 5110.38,2877.7 5120.38,2887.7 5192.3,2887.7 v1(5209,2871)
  L8_BOTTOM w6: v1(3674,3045) 3672.85,3043.85 3672.85,3037.38 3672,3036.53 3672,3011.88 3668.49,3008.36 3633.62,3008.36 3625.98,3016 3499.61,3016 3488,3027.62 3488,3032.53 3463.53,3057 3433.38,3057 3432.38,3056 3415,3056 3371,3012 3371,2828.48 3374.51,2824.97 3438.46,2824.97 3446.07,2817.35 3446.07,2806.58 3438.46,2798.97 3383.42,2798.97 3379.9,2795.45 3379.9,2783.76 3427.69,2735.98 3434.41,2735.98 3452,2718.38 3452,2701 3456,2697 3465.38,2697 3473,2689.38 3473,2678.62 3457,2662.62 3457,2582.51 3453.49,2579 3426.62,2579 3402,2554.38 3402,2494.92 3412.27,2484.65 3502.73,2484.65 3513,2474.38 3513,2456.38 3524,2445.38 3524,2417.62 3515.38,2409 3418.51,2409 3415,2405.49 3415,2286.51 3422.51,2279 3515.91,2279 3519.91,2283 3613.31,2283 3621.54,2274.76 3725.57,2274.76 3763.33,2237 3807.67,2237 3838.67,2268 3938.69,2268 3946.35,2260.34 3958.07,2260.34 3973.73,2276 3988.29,2276 3990.21,2276 4001.88,2286 4067.36,2331 4069.28,2331 4112.93,2331 4188.85,2337.86 cw(c4192,2303) 4192,2338 4306.5,2338 4350.5,2294 4398.38,2294 4421.24,2316.86 4426,2407.47 4426,2434.81 4423,2471.62 4404,2490.61 4404,2561.61 4394,2571.62 4394,2582.38 4438.47,2626.86 4448.53,2626.86 4493,2671.33 4493,2674.36 4499.64,2681 4640.62,2681 4687,2727.38 v1(4687,2729)
LCD_B4: M5.29 M30.23 R261.2 U1A.C8 | length 8370.3
  L1_TOP w2: U1A.C8@3605.52,2922.98 3605.75,2922.98 3616,2933.23 3623.23,2933.23 v1(3625,2935)
  L1_TOP w6: R261.2@4483.56,168 4518.79,168 4528.79,178 v1(4530,178) ; v1(4700,2579) 4768.99,2579 M30.23@4770.99,2581 ; v1(5102.46,2979.44) M5.29@5185.32,2979.44
  L3_HS1 w6: v1(2998,3541) 2998,3447.38 2986,3435.38 2986,3156 2993,3149 3020.62,3149 3154.62,3283 3360.7,3283 3368.7,3291 3409.3,3291 3422.3,3278 3452.62,3278 3462.62,3268 3473.38,3268 3482.38,3277 3527.38,3277 3543.38,3293 3570.15,3293 3590.15,3313 3676.27,3313 3692.27,3297 3778.38,3297 3798.57,3317.18 3798.57,3428.57 3862,3492 3862,3553.52 3852,3563.52 3852,3629 3860,3637 3863.97,3637 3865.47,3638.5 3886.43,3638.5 3887.93,3637 3922.62,3637 4317.62,3242 4830,3242 4840.85,3231.15 4840.85,3225.62 4902.47,3164 4908.49,3164 4923,3149.49 v1(4923,3147) ; v1(4700,2579) 4764.81,2579 4772.81,2571 4821.86,2571 5021.86,2771 5022.38,2771 5047.38,2796 5061.58,2796 5068.6,2803.02 5095.38,2803.02 5113.86,2821.5 5113.86,2968.05 v1(5102.46,2979.44)
  L4_POWER w6: v1(2998,3541) 3075.72,3463.28 3075.72,3429.1 3065,3418.38 3065,3407 3027,3369 2947.62,3369 2940,3361.38 2940,3353 2932,3345 2932,3213.62 2946.62,3199 2959.31,3199 2962.31,3202 2975,3202 2985,3212 3061.38,3212 3067.38,3218 3107.49,3218 3133,3192.49 3133,3109.7 3143,3099.7 3143,3022.27 3183.27,2982 3284.02,2982 3297.02,2995 3565,2995 v1(3625,2935)
  L8_BOTTOM w6: v1(4530,178) 4488.51,178 4483,183.51 4483,1271.72 4383.22,1371.5 4254.07,1371.5 4243.57,1382 4222.47,1382 4209,1395.47 4209,1729.15 4465,1985.15 4465,1990.77 4491,2016.77 4491,2423.37 4646.63,2579 v1(4700,2579) ; v1(4923,3147) 5089.41,2980.59 5101.32,2980.59 v1(5102.46,2979.44)
LCD_B5: M5.31 M30.21 R262.2 U1A.B8 | length 7677.8
  L1_TOP w4: v1(3603,3045) 3603,3042.84 3596.52,3036.35 3596.52,2963.48 U1A.B8@3605.52,2954.48
  L1_TOP w6: R262.2@4432.12,320 4436.12,324 v1(4455,324) ; v1(4698,2515) 4699.62,2515 4704.63,2520 4760,2520 M30.21@4770.99,2531 ; M5.31@5185.32,3058.18 5203.5,3058.18 5220,3074.68 v1(5220,3088)
  L3_HS1 w6: v1(4154,3081) 4155,3082 4155,3096 4170.24,3111.24 4418.37,3111.24 4419.62,3110 4431.62,3110 4453.62,3132 4662.53,3132 4676.53,3118 4693.52,3118 4703.52,3128 4847.37,3128 4852,3123.37 4853.15,3123.37 4879,3097.53 4879,3078.47 4852,3051.47 4852,2824.83 4908.83,2768 4940.31,2768 4974,2801.69 4974,2801.81 4981,2808.81 4981,3096.53 4995.47,3111 5197,3111 v1(5220,3088)
  L4_POWER w6: v1(3603,3045) 3603,3046.62 3610,3053.62 3610,3054.38 3618.42,3062.81 3685.56,3062.81 3707.76,3085 3746.38,3085 3767.46,3085 3771.82,3080.64 3785.5,3080.64 3785.86,3081 3816.33,3081 3821.33,3076 3876,3076 3880,3072 3934.67,3072 3960,3046.67 3960,3038.19 3985.19,3013 3988.19,3013 3993.19,3008 4028.81,3008 4038.81,3018 4061.38,3018 4081,3037.62 4081,3040.38 4106.47,3065.85 4138.85,3065.85 v1(4154,3081) ; v1(4698,2515) 4560.62,2652.38 4556.23,2652.38 4420,2788.62 4420,2918 4459,2957 4627.38,2957 4744.04,2840.35 4744.04,2759.96 4863.51,2640.49 4868.49,2640.49 4872,2644 4872,2744.31 4676,2940.32 4676,2959.38 4684.61,2968 4754.38,2968 4887.38,3101 5207,3101 v1(5220,3088)
  L8_BOTTOM w6: v1(4455,324) 4456,325 4456,797.91 4458,799.91 4458,1268.43 4374.93,1351.5 4245.79,1351.5 4235.29,1362 4214.19,1362 4189,1387.19 4189,1737.43 4445,1993.43 4445,1999.05 4471,2025.05 4471,2431.66 4641.34,2602 4709.53,2602 4723,2588.53 4723,2540 v1(4698,2515)